# Altium PCB QuarterBridge_verL.PcbDoc
Units mil, origin at the board's own origin, x right, y up, seen from the top; angles counter-clockwise.
Board outline 2755.91 x 2562.99 mil, 2 copper layers (TopLayer, BottomLayer), stack 62.992 mil thick; 60 components, 67 nets, 267 pads, 42 vias.
Unrouted connection lines stored in the file: 66.
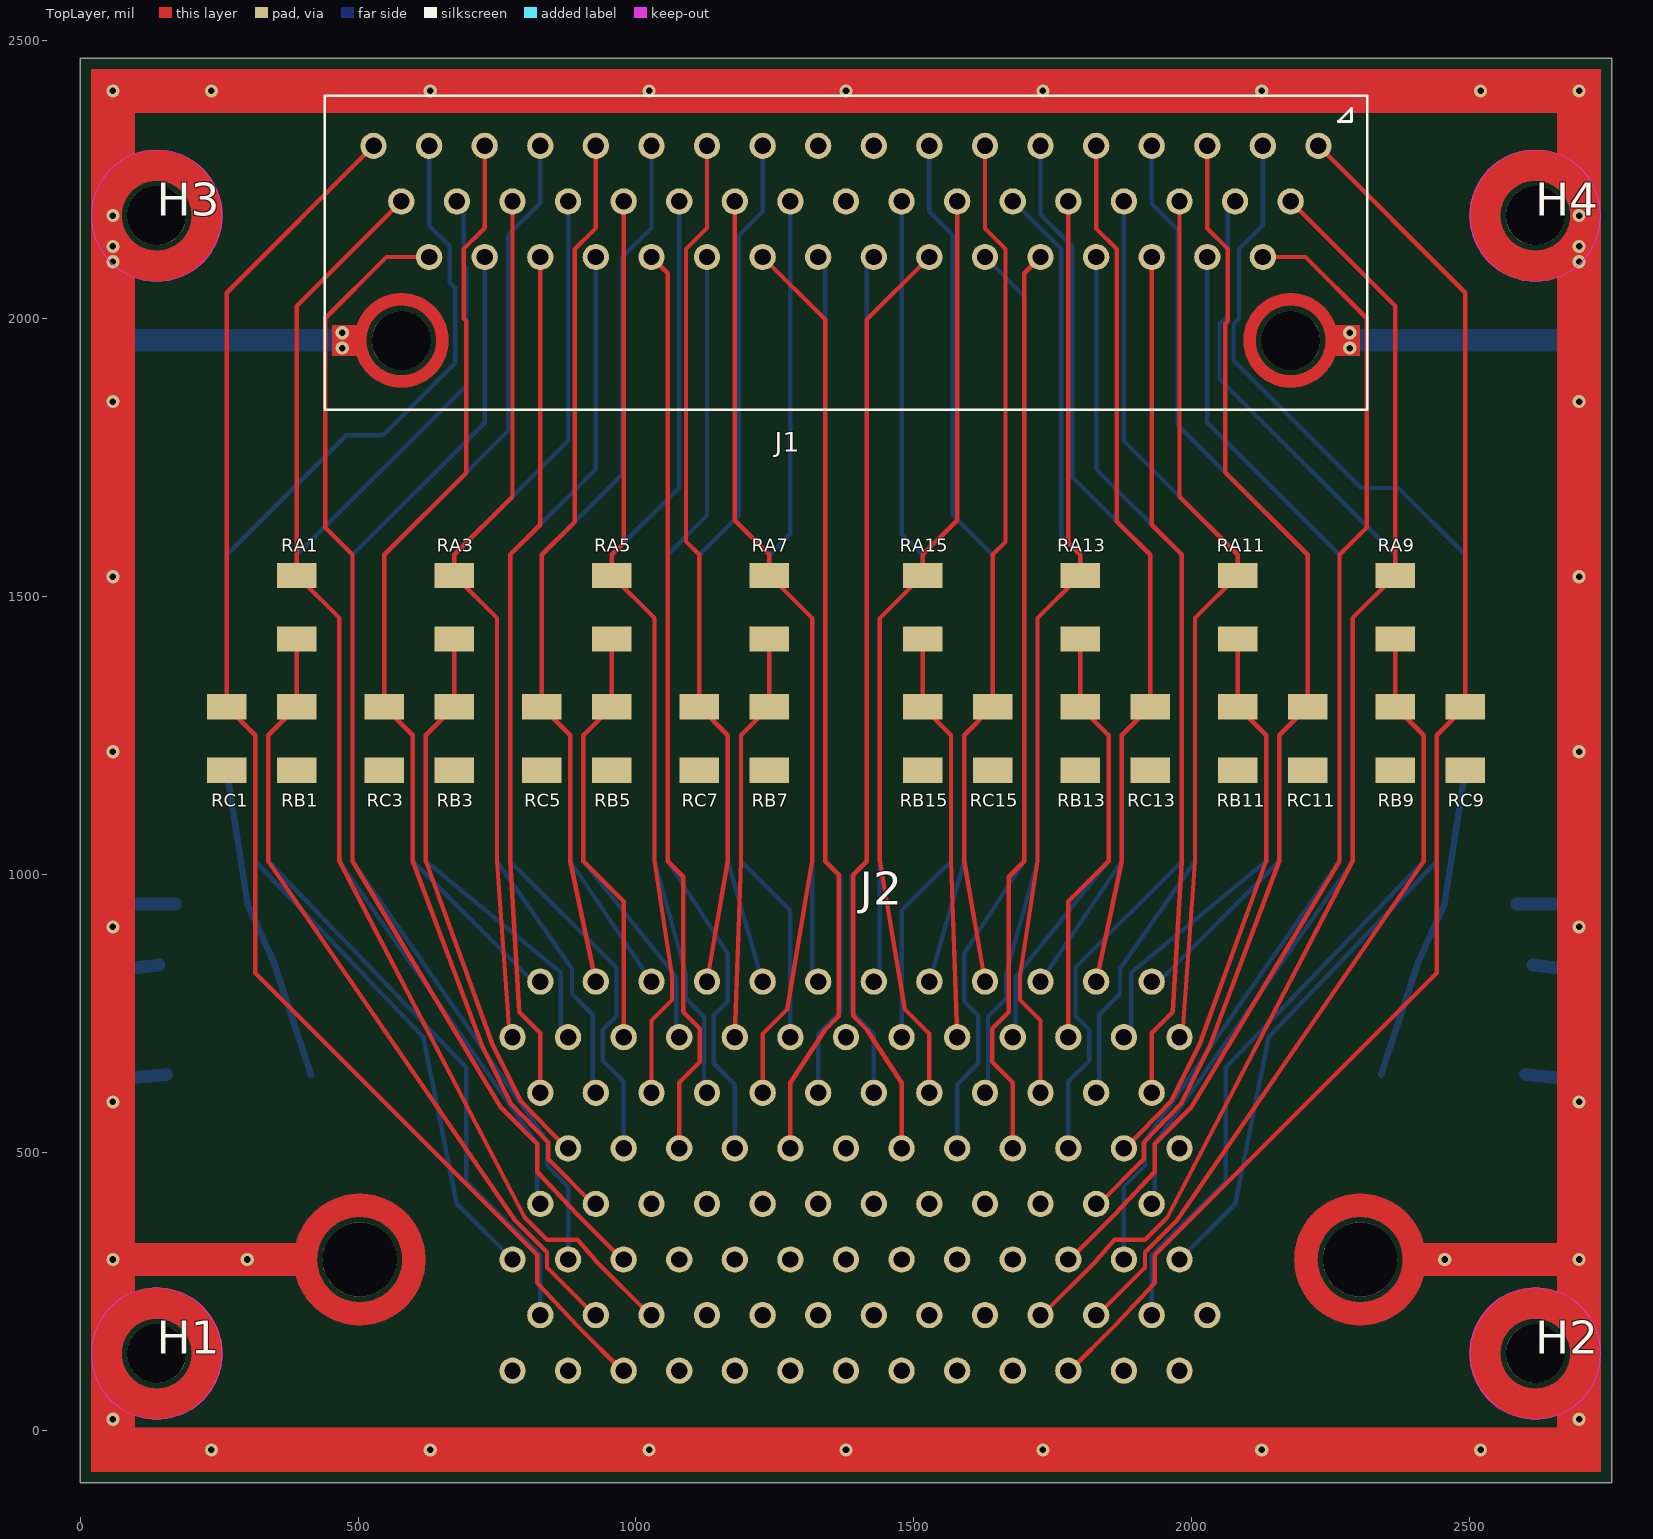
[diagram p0: TopLayer view]
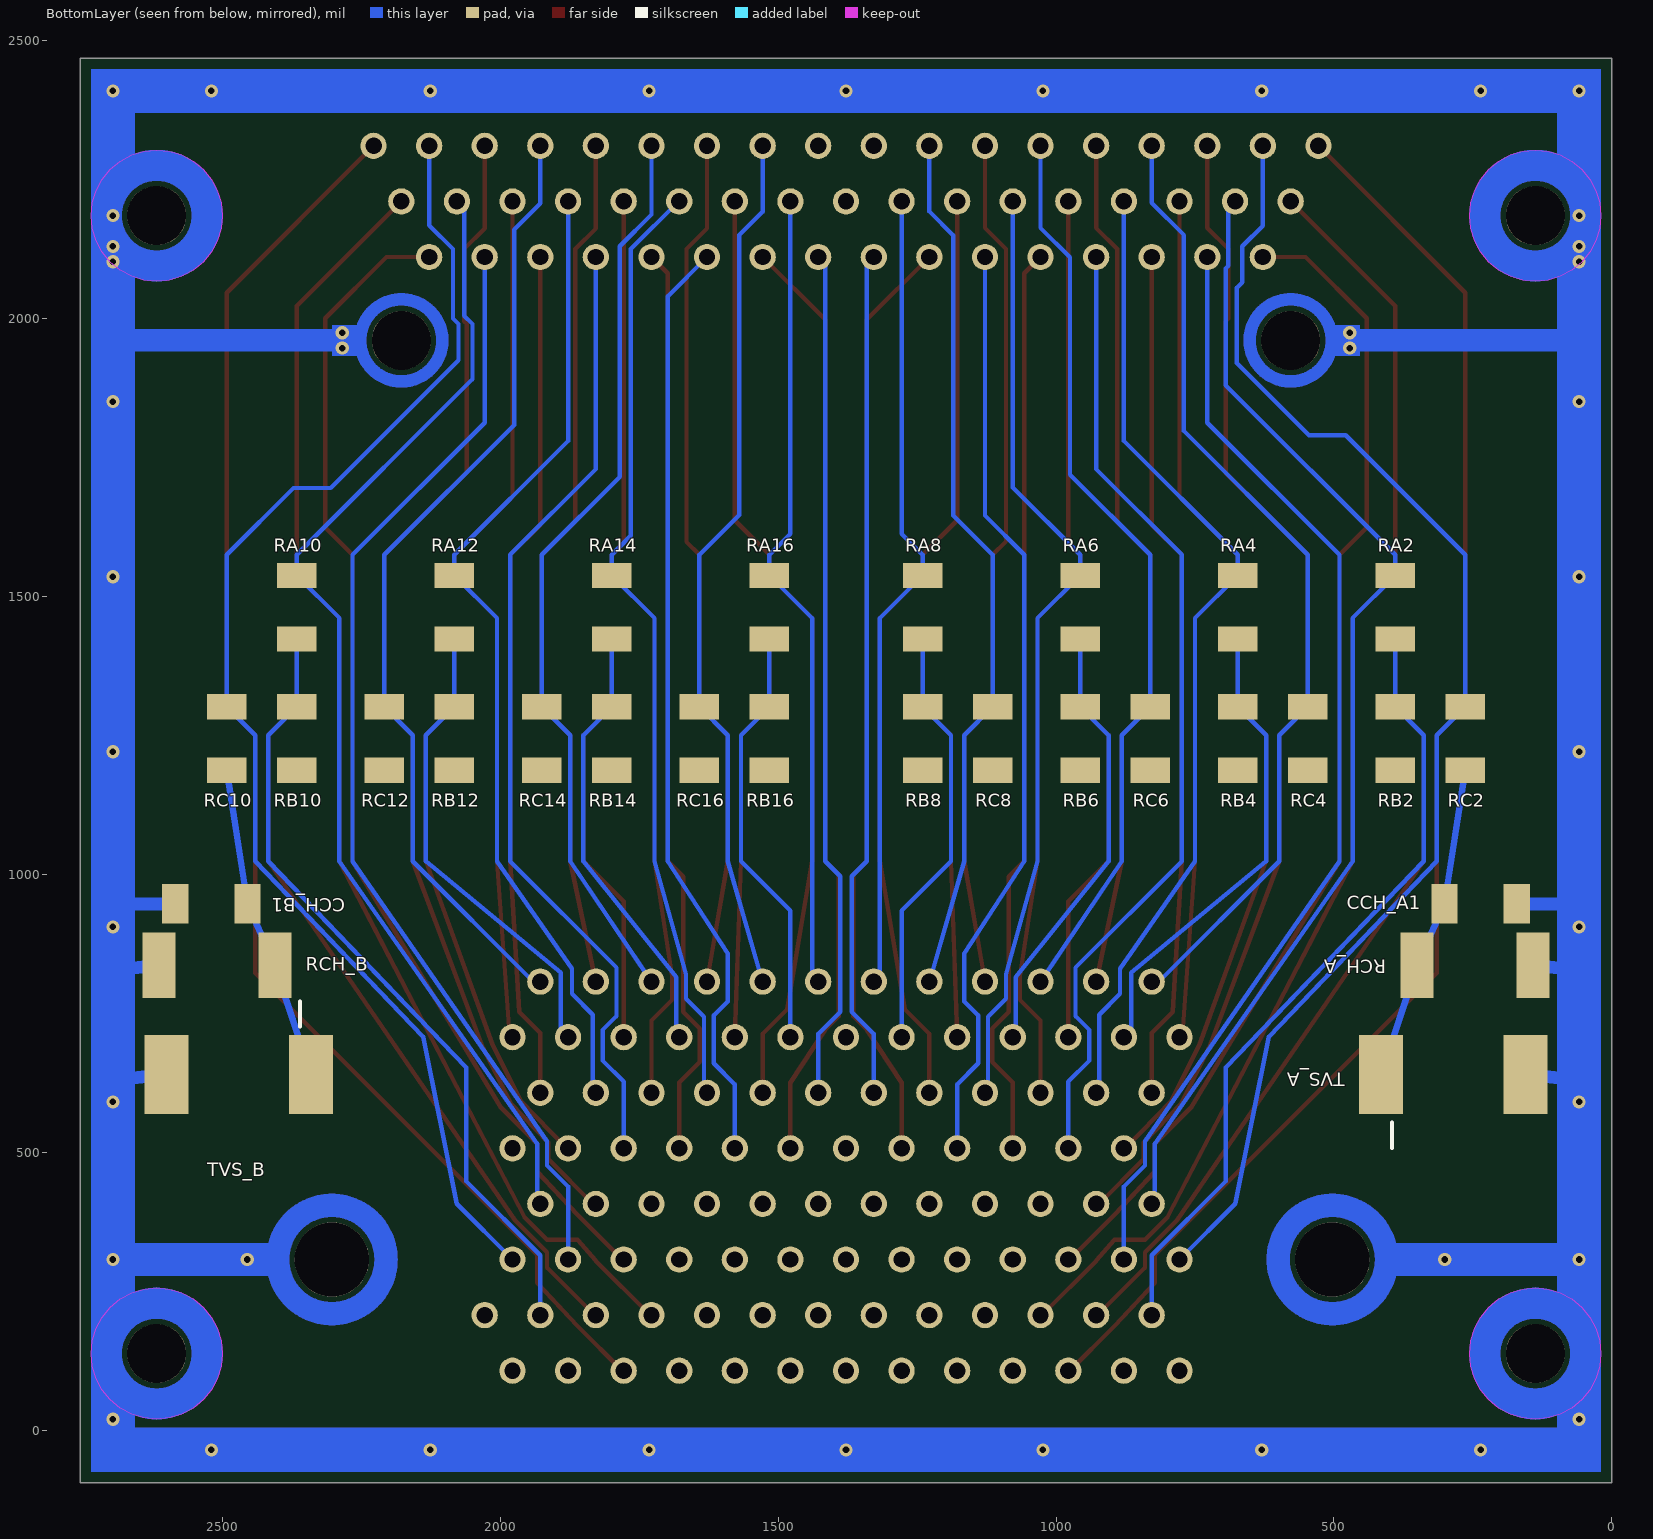
[diagram p1: BottomLayer view, seen from below]
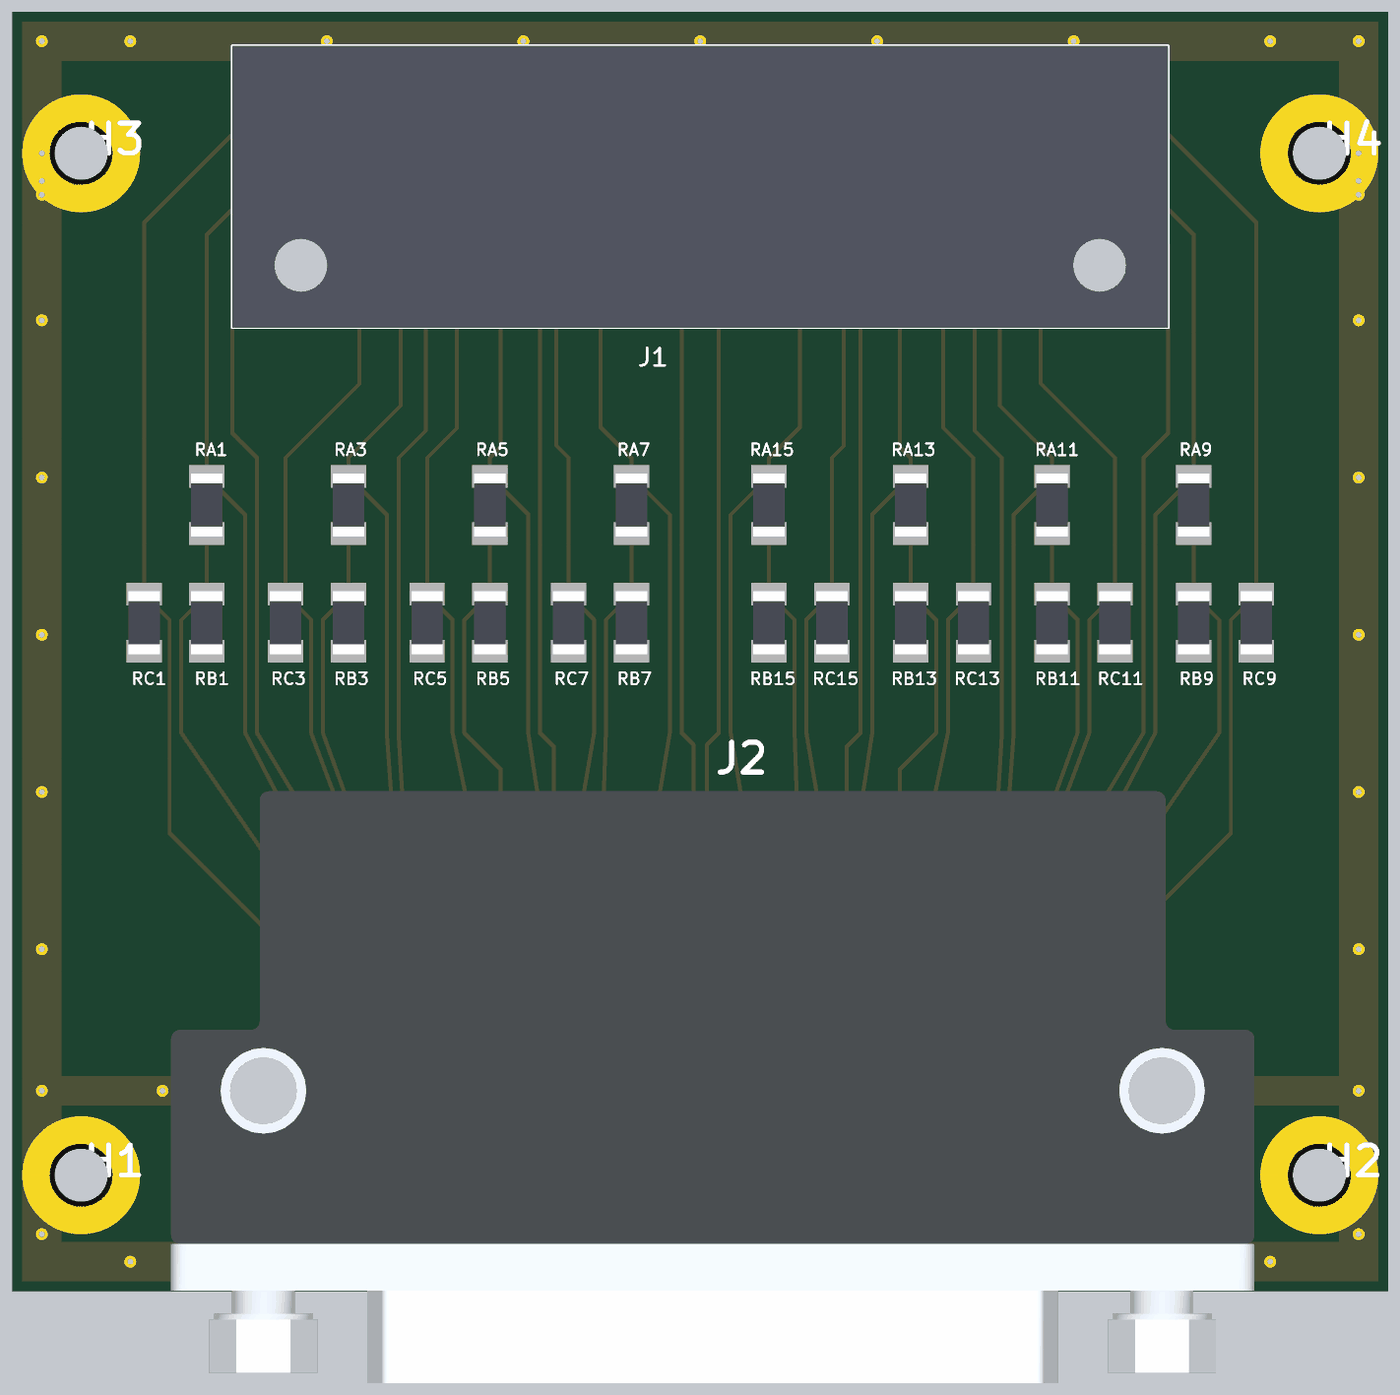
[diagram p2: 3D render of the assembled board from above, using the file's embedded part models]
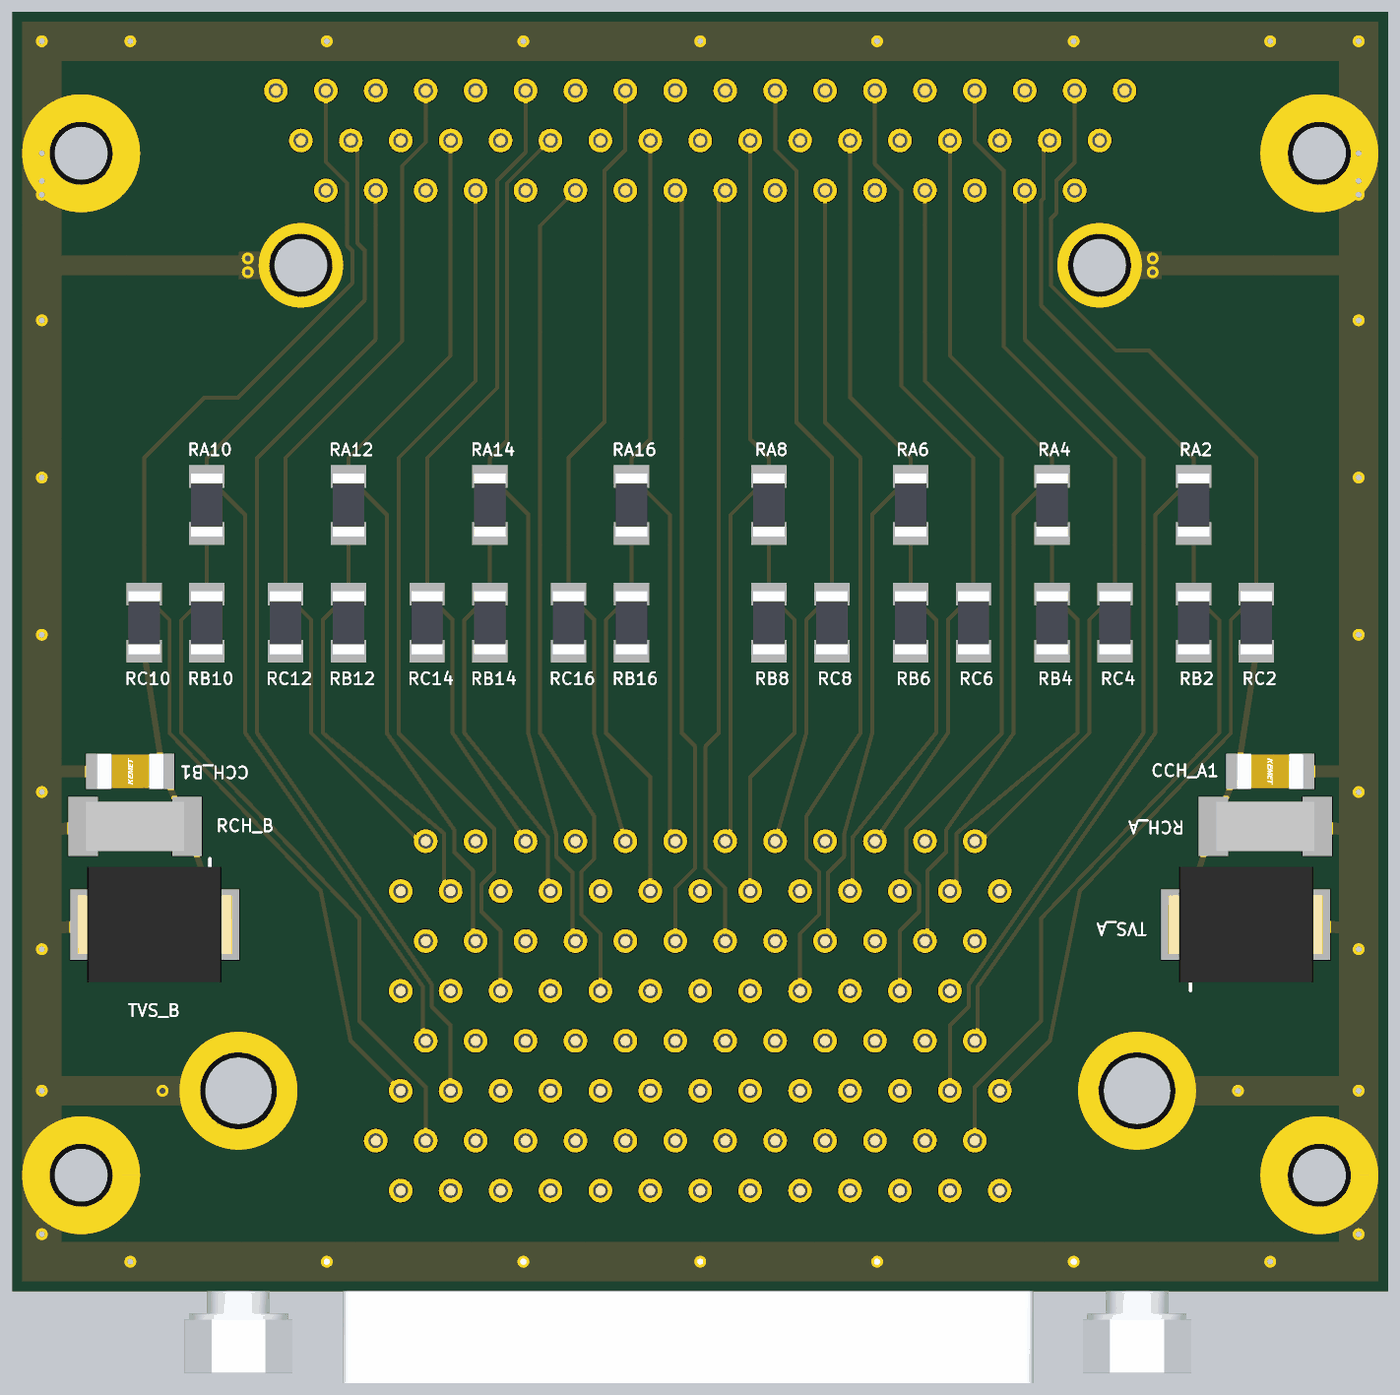
[diagram p3: 3D render of the assembled board from below, using the file's embedded part models]

## Layer stack, top to bottom
Top Solder: solder mask 0.4, Solder Resist, Dk 3.5
TopLayer: signal copper 1.378
CORE: core 60.2361, FR-4, Dk 4.2
BottomLayer: signal copper 1.378
Bottom Solder: solder mask 0.4, Solder Resist, Dk 3.5

## Board outline
0,-94.49 2755.91,-94.49 2755.91,2468.5 0,2468.5

## Design rules (kind name [scope] priority, off if disabled: settings)
Clearance CHASSIS_TO_AGND_2MM [InNet('CHASSIS_GND') vs InNet('AGND_A') Or InNet('AGND_B')] p1: gap=78.74 ignorepadtopadclearanceinfootprint=FALSE
Clearance [All] p2: gap=7.87 ignorepadtopadclearanceinfootprint=FALSE
HoleSize [All] p1: absolutevalues=TRUE maxlimit=157.48 minlimit=1 maxpercent=80.000 minpercent=20.000
PolygonConnect [All] p1: connectstyle=Relief reliefconductorwidth=10 reliefentries=4 polygonreliefangle="90 Angle" airgapwidth=10
RoutingVias [All] p1: holewidth=11.81 width=23.62 viastyle="Through Hole" minholewidth=11.81 minwidth=23.62 maxholewidth=15.75 maxwidth=31.5
SolderMaskExpansion TENT_CHASSIS_VIAS [IsVia And InNet('CHASSIS_GND')] p1: expansion=-15 istentingtop=FALSE
SolderMaskExpansion [All] p2: expansion=0 istentingtop=FALSE
Width WIDTH_CHASSIS_BRIDGE [InNet('CHASSIS_GND')] p1: maxlimit=40 minlimit=8 preferedwidth=24
Width [All] p2: maxlimit=23.62 minlimit=7.87 preferedwidth=7.87
29 further rules are at their usual default settings.

## Components (designator, comment, footprint, x,y, rotation, side; value= is the part's Value field where it differs from the comment)
CCH_A1 "2.2nF / 2kV" QB_CHASSIS_C1206_X7R_2KV 236.22,946.85 r0 bottom
CCH_B1 "2.2nF / 2kV" QB_CHASSIS_C1206_X7R_2KV 2519.68,946.85 r180 bottom
H1 "Comment" QB69_M2P5_NPTH 137.8,137.8 r0 top
H2 "Comment" QB69_M2P5_NPTH 2618.11,137.8 r0 top
H3 "Comment" QB69_M2P5_NPTH 137.8,2185.04 r0 top
H4 "Comment" QB69_M2P5_NPTH 2618.11,2185.04 r0 top
J1 "M83513/17-G02NP 51 PIN BR verL" QB51_BR_PIN_VERL 1377.95,1960.63 r0 top
J2 "100 PIN CBR GROUPED" QB69_CBR100_PIN_R1 1402.95,307 r0 top
RA1 "120R" QB69_TNPU1206_R1 389.76,1480.71 r270 top
RA2 "120R" QB69_TNPU1206_R1 389.76,1480.71 r270 bottom
RA3 "120R" QB69_TNPU1206_R1 673.23,1480.71 r270 top
RA4 "120R" QB69_TNPU1206_R1 673.23,1480.71 r270 bottom
RA5 "120R" QB69_TNPU1206_R1 956.69,1480.71 r270 top
RA6 "120R" QB69_TNPU1206_R1 956.69,1480.71 r270 bottom
RA7 "120R" QB69_TNPU1206_R1 1240.16,1480.71 r270 top
RA8 "120R" QB69_TNPU1206_R1 1240.16,1480.71 r270 bottom
RA9 "120R" QB69_TNPU1206_R1 2366.14,1480.71 r270 top
RA10 "120R" QB69_TNPU1206_R1 2366.14,1480.71 r270 bottom
RA11 "120R" QB69_TNPU1206_R1 2082.68,1480.71 r270 top
RA12 "120R" QB69_TNPU1206_R1 2082.68,1480.71 r270 bottom
RA13 "120R" QB69_TNPU1206_R1 1799.21,1480.71 r270 top
RA14 "120R" QB69_TNPU1206_R1 1799.21,1480.71 r270 bottom
RA15 "120R" QB69_TNPU1206_R1 1515.75,1480.71 r270 top
RA16 "120R" QB69_TNPU1206_R1 1515.75,1480.71 r270 bottom
RB1 "120R" QB69_TNPU1206_R1 389.76,1244.49 r270 top
RB2 "120R" QB69_TNPU1206_R1 389.76,1244.49 r270 bottom
RB3 "120R" QB69_TNPU1206_R1 673.23,1244.49 r270 top
RB4 "120R" QB69_TNPU1206_R1 673.23,1244.49 r270 bottom
RB5 "120R" QB69_TNPU1206_R1 956.69,1244.49 r270 top
RB6 "120R" QB69_TNPU1206_R1 956.69,1244.49 r270 bottom
RB7 "120R" QB69_TNPU1206_R1 1240.16,1244.49 r270 top
RB8 "120R" QB69_TNPU1206_R1 1240.16,1244.49 r270 bottom
RB9 "120R" QB69_TNPU1206_R1 2366.14,1244.49 r270 top
RB10 "120R" QB69_TNPU1206_R1 2366.14,1244.49 r270 bottom
RB11 "120R" QB69_TNPU1206_R1 2082.68,1244.49 r270 top
RB12 "120R" QB69_TNPU1206_R1 2082.68,1244.49 r270 bottom
RB13 "120R" QB69_TNPU1206_R1 1799.21,1244.49 r270 top
RB14 "120R" QB69_TNPU1206_R1 1799.21,1244.49 r270 bottom
RB15 "120R" QB69_TNPU1206_R1 1515.75,1244.49 r270 top
RB16 "120R" QB69_TNPU1206_R1 1515.75,1244.49 r270 bottom
RC1 "120R" QB69_TNPU1206_R1 263.78,1244.49 r90 top
RC2 "120R" QB69_TNPU1206_R1 263.78,1244.49 r90 bottom
RC3 "120R" QB69_TNPU1206_R1 547.24,1244.49 r90 top
RC4 "120R" QB69_TNPU1206_R1 547.24,1244.49 r90 bottom
RC5 "120R" QB69_TNPU1206_R1 830.71,1244.49 r90 top
RC6 "120R" QB69_TNPU1206_R1 830.71,1244.49 r90 bottom
RC7 "120R" QB69_TNPU1206_R1 1114.17,1244.49 r90 top
RC8 "120R" QB69_TNPU1206_R1 1114.17,1244.49 r90 bottom
RC9 "120R" QB69_TNPU1206_R1 2492.13,1244.49 r90 top
RC10 "120R" QB69_TNPU1206_R1 2492.13,1244.49 r90 bottom
RC11 "120R" QB69_TNPU1206_R1 2208.66,1244.49 r90 top
RC12 "120R" QB69_TNPU1206_R1 2208.66,1244.49 r90 bottom
RC13 "120R" QB69_TNPU1206_R1 1925.2,1244.49 r90 top
RC14 "120R" QB69_TNPU1206_R1 1925.2,1244.49 r90 bottom
RC15 "120R" QB69_TNPU1206_R1 1641.73,1244.49 r90 top
RC16 "120R" QB69_TNPU1206_R1 1641.73,1244.49 r90 bottom
RCH_A "2M / 2kV max" QB_CHASSIS_R2010_HV 246.06,836.61 r0 bottom
RCH_B "2M / 2kV max" QB_CHASSIS_R2010_HV 2509.84,836.61 r180 bottom
TVS_A "SMCJ5.0A" QB_CHASSIS_SMC_AK 285.43,639.76 r0 bottom
TVS_B "SMCJ5.0A" QB_CHASSIS_SMC_AK 2470.47,639.76 r180 bottom

## Footprints (in the part's own frame and the unit in brackets; to place one, negate y for a bottom-side part, rotate by r counter-clockwise, add the part's x,y. Pads: shape width x height; smd on the part's side, far side on the other; paste and mask are expansions set on the pad)
QB51_BR_PIN_VERL [mm] "BR 51 male M83513/17; 18/17/16 rows; PCB mount pitch40.64mm; per annotated user pattern"
  round 1.2 hole 0.75 mask+0.05: 1(21.59,8.89) 2(19.05,8.89) 3(16.51,8.89) 4(13.97,8.89) 5(11.43,8.89) 6(8.89,8.89) 7(6.35,8.89) 8(3.81,8.89) 9(1.27,8.89) 10(-1.27,8.89) 11(-3.81,8.89) 12(-6.35,8.89) 13(-8.89,8.89) 14(-11.43,8.89) 15(-13.97,8.89) 16(-16.51,8.89) 17(-19.05,8.89) 18(-21.59,8.89) 19(20.32,6.35) 20(17.78,6.35) 21(15.24,6.35) 22(12.7,6.35) 23(10.16,6.35) 24(7.62,6.35) 25(5.08,6.35) 26(2.54,6.35) 27(0,6.35) 28(-2.54,6.35) 29(-5.08,6.35) 30(-7.62,6.35) 31(-10.16,6.35) 32(-12.7,6.35) 33(-15.24,6.35) 34(-17.78,6.35) 35(-20.32,6.35) 36(19.05,3.81) 37(16.51,3.81) 38(13.97,3.81) 39(11.43,3.81) 40(8.89,3.81) 41(6.35,3.81) 42(3.81,3.81) 43(1.27,3.81) 44(-1.27,3.81) 45(-3.81,3.81) 46(-6.35,3.81) 47(-8.89,3.81) 48(-11.43,3.81) 49(-13.97,3.81) 50(-16.51,3.81) 51(-19.05,3.81)
  round 2.7 hole 2.7 unplated mask+0: ""(-20.32,0) ""(20.32,0)
  silkscreen extent -23.81,-3.17 23.81,11.17, body extent -23.81,-3.17 23.81,11.17, height 8.92
QB69_CBR100_PIN_R1 [mm] "CATALOG PIN draft; component-side view; drill sizes provisional"
  round 1.2 hole 0.75 mask+0.05: 1(-15.875,-5.08) 2(-14.605,-2.54) 3(-13.335,-5.08) 4(-12.065,-2.54) 5(-10.795,-5.08) 6(-9.525,-2.54) 7(-8.255,-5.08) 8(-6.985,-2.54) 9(-5.715,-5.08) 10(-4.445,-2.54) 11(-3.175,-5.08) 12(-1.905,-2.54) 13(-0.635,-5.08) 14(0.635,-2.54) 15(1.905,-5.08) 16(3.175,-2.54) 17(4.445,-5.08) 18(5.715,-2.54) 19(6.985,-5.08) 20(8.255,-2.54) 21(9.525,-5.08) 22(10.795,-2.54) 23(12.065,-5.08) 24(13.335,-2.54) 25(14.605,-5.08) 26(15.875,-2.54) 27(-15.875,0) 28(-14.605,2.54) 29(-13.335,0) 30(-12.065,2.54) 31(-10.795,0) 32(-9.525,2.54) 33(-8.255,0) 34(-6.985,2.54) 35(-5.715,0) 36(-4.445,2.54) 37(-3.175,0) 38(-1.905,2.54) 39(-0.635,0) 40(0.635,2.54) 41(1.905,0) 42(3.175,2.54) 43(4.445,0) 44(5.715,2.54) 45(6.985,0) 46(8.255,2.54) 47(9.525,0) 48(10.795,2.54) 49(12.065,0) 50(13.335,2.54) 51(14.605,0) 52(-14.605,7.62) 53(-13.335,5.08) 54(-12.065,7.62) 55(-10.795,5.08) 56(-9.525,7.62) 57(-8.255,5.08) 58(-6.985,7.62) 59(-5.715,5.08) 60(-4.445,7.62) 61(-3.175,5.08) 62(-1.905,7.62) 63(-0.635,5.08) 64(0.635,7.62) 65(1.905,5.08) 66(3.175,7.62) 67(4.445,5.08) 68(5.715,7.62) 69(6.985,5.08) 70(8.255,7.62) 71(9.525,5.08) 72(10.795,7.62) 73(12.065,5.08) 74(13.335,7.62) 75(14.605,5.08) 76(-15.875,10.16) 77(-14.605,12.7) 78(-13.335,10.16) 79(-12.065,12.7) 80(-10.795,10.16) 81(-9.525,12.7) 82(-8.255,10.16) 83(-6.985,12.7) 84(-5.715,10.16) 85(-4.445,12.7) 86(-3.175,10.16) 87(-1.905,12.7) 88(-0.635,10.16) 89(0.635,12.7) 90(1.905,10.16) 91(3.175,12.7) 92(4.445,10.16) 93(5.715,12.7) 94(6.985,10.16) 95(8.255,12.7) 96(9.525,10.16) 97(10.795,12.7) 98(12.065,10.16) 99(13.335,12.7) 100(14.605,10.16)
  round 3.4 hole 3.4 unplated mask+0: ""(-22.86,0) ""(22.86,0)
  body extent -27.56,-14.88 27.56,15.24, height 10.01
QB69_M2P5_NPTH [mm] "M2.5 NPTH 2.7mm, 6mm tool envelope"
  round 2.7 hole 2.7 unplated mask+0: ""(0,0)
QB69_TNPU1206_R1 [mm] "Vishay doc28950 p1 IPC7351 reflow 1206; G1.75 Y1.15 X1.80 Z4.05 mm"
  rect 1.15x1.8 smd: 1(-1.45,0) 2(1.45,0)
  body extent -1.6,-0.8 1.6,0.8, height 0.55
QB_CHASSIS_C1206_X7R_2KV [mm] "KEMET individual specsheet; maximum package dimensions; designer HV lands have 2.1mm inner copper gap."
  rect 1.2x1.8 smd paste+0 mask+0.05: 1(-1.65,0) 2(1.65,0)
  body extent -1.7,-0.9 1.7,0.9, height 1.75
QB_CHASSIS_R2010_HV [mm] "Bourns CHV datasheet; 2010 0.5W voltage ceiling 2kV; continuous 2kV at 2M would require 2W and is NOT qualified."
  rect 1.5x3 smd paste+0 mask+0.05: 1(-2.65,0) 2(2.65,0)
  body extent -2.5,-1.25 2.5,1.25, height 0.6
QB_CHASSIS_SMC_AK [mm] "Vishay document88394; pin1=Anode, pin2=Cathode. Land gap4.6mm, lands2x3.6mm."
  rect 2x3.6 smd paste+0 mask+0.05: 1(-3.3,0) 2(3.3,0)
  silkscreen extent 2.8,2.2 2.8,3.35, body extent -3.95,-2.95 3.95,2.95, height 2.26

## Part data
CCH_A1 CCH_B1: library part CHASSIS_CAP_HV
H1 H2 H3 H4: library part QB69_M2P5_NPTH
J1: library part QB51_BR_INPUT_VERL
J2: library part QB100_OUTPUT_ROUNDED
RA1 RA2 RA3 RA4 RA5 RA6 RA7 RA8 RA9 RA10 RA11 RA12 RA13 RA14 RA15 RA16 RB1 RB2 RB3 RB4 RB5 RB6 RB7 RB8 RB9 RB10 RB11 RB12 RB13 RB14 RB15 RB16 RC1 RC2 RC3 RC4 RC5 RC6 RC7 RC8 RC9 RC10 RC11 RC12 RC13 RC14 RC15 RC16: library part TNPU1206120RAZEN00_ANSI_1
RCH_A RCH_B: library part CHASSIS_HV_R_2M
TVS_A TVS_B: library part CHASSIS_TVS_SMCJ

## Via types
v1: diameter 23.62, hole 11.81, TopLayer to BottomLayer, 42 vias

## Nets (pads, with @x,y where several pads share a name; then routed paths per layer and width w, separated by ;. In a path a pad name is that pad's centre, name@x,y a point inside that pad or via, vN(x,y) a via of type N, cw(c..) or ccw(c..) an arc to the next point about the centre after c; other vN are vias at no path point)
AGND_A: CCH_A1.2 J2.1 J2.3 J2.7 J2.8 J2.9 J2.10 J2.11 J2.12 J2.13 J2.32 J2.33 J2.34 J2.35 J2.36 J2.37 J2.38 J2.39 J2.63 J2.88 RB1.2 RB2.2 RB3.2 RB4.2 RB5.2 RB6.2 RB7.2 RB8.2 RC1.1 RC2.1 RC3.1 RC4.1 RC5.1 RC6.1 RC7.1 RC8.1 RCH_A.2 TVS_A.2 | length 571.5
  BottomLayer w11.81: RC2.1 CCH_A1.2 RCH_A.2 TVS_A.2
AGND_B: CCH_B1.2 J2.14 J2.15 J2.16 J2.17 J2.18 J2.19 J2.23 J2.25 J2.26 J2.40 J2.41 J2.42 J2.43 J2.44 J2.45 J2.46 J2.75 RB9.2 RB10.2 RB11.2 RB12.2 RB13.2 RB14.2 RB15.2 RB16.2 RC9.1 RC10.1 RC11.1 RC12.1 RC13.1 RC14.1 RC15.1 RC16.1 RCH_B.2 TVS_B.2 | length 571.5
  BottomLayer w11.81: TVS_B.2 RCH_B.2 CCH_B1.2 RC10.1
CHASSIS_GND: CCH_A1.1 CCH_B1.1 RCH_A.1 RCH_B.1 TVS_A.1 TVS_B.1 | length 584.8
  BottomLayer w23.62: 59.06,629.92 TVS_A.1 ; 59.06,826.77 RCH_A.1 ; 59.06,946.85 CCH_A1.1 ; CCH_B1.1 2696.85,946.85 ; TVS_B.1 2696.85,629.92 ; RCH_B.1 2696.85,826.77
  other v1: 236.22,-35.43 629.92,-35.43 1023.62,-35.43 1377.95,-35.43 1732.28,-35.43 2125.98,-35.43 2519.68,-35.43 59.06,19.68 2696.85,19.68 59.06,307.09 300.79,307 2455.12,307 2696.85,307.09 59.06,590.55 2696.85,590.55 59.06,905.51 2696.85,905.51 59.06,1220.47 2696.85,1220.47 59.06,1535.43 2696.85,1535.43 59.06,1850.39 2696.85,1850.39 471.65,1946.85 2284.25,1946.85 471.65,1974.41 2284.25,1974.41 59.06,2102.06 2696.85,2102.06 59.06,2129.61 2696.85,2129.61 59.06,2185.04 2696.85,2185.04 59.06,2409.45 236.22,2409.45 629.92,2409.45 1023.62,2409.45 1377.95,2409.45 1732.28,2409.45 2125.98,2409.45 2519.68,2409.45 2696.85,2409.45
P+_01: J1.35 J2.6 RA1.1 | length 2319.2
  TopLayer w7.87: J1.35 389.76,2022.44 389.76,1574.8 RA1.1 466.54,1461.02 466.54,1023.62 800,382.5 840,342.5 895,342.5 927.5,305 J2.6@1025.5,207
P+_02: J1.34 J2.28 RA2.1 | length 2058.6
  BottomLayer w7.87: J1.34@690,2198.58 690,2095 695,2090 695,1880.04 389.76,1574.8 RA2.1 466.54,1461.02 466.54,1023.62 822.5,515 J2.28@822.5,412.45
P+_03: J1.33 J2.76 RA3.1 | length 1574.2
  TopLayer w7.87: J2.76@772.5,712.45 750,1023.62 750,1461.02 RA3.1 673.23,1574.8 777.95,1679.53 J1.33
P+_04: J1.32 J2.54 RA4.1 | length 1772.7
  BottomLayer w7.87: J1.32 877.95,1779.53 673.23,1574.8 RA4.1 750,1461.02 750,1023.62 885,830 885,784.99 922.5,747.49 J2.54@922.5,612.45
P+_05: J1.31 J2.56 RA5.1 | length 1662
  TopLayer w7.87: J1.31 977.95,1596.06 956.69,1574.8 RA5.1 1033.46,1461.02 1033.46,1023.62 1065,817.5 1065,774.14 1027.95,737.09 J2.56
P+_06: J1.30 J2.58 RA6.1 | length 1701.4
  BottomLayer w7.87: J1.30 1077.95,1696.06 956.69,1574.8 RA6.1 1033.46,1461.02 1033.46,1023.62 1090,820 1090,776.24 1122.5,743.74 J2.58@1122.5,612.45
P+_07: J1.29 J2.60 RA7.1 | length 1683.3
  TopLayer w7.87: J1.29 1177.95,1637.01 1240.16,1574.8 RA7.1 1316.93,1461.02 1316.93,1023.62 1272.5,757.5 1227.95,712.95 J2.60
P+_08: J1.28 J2.87 RA8.1 | length 1440.1
  BottomLayer w7.87: J1.28 1277.95,1612.6 1240.16,1574.8 RA8.1 1316.93,1461.02 1316.93,1023.62 J2.87@1316.93,818.02
P+_09: J1.19 J2.20 RA9.1 | length 2319.2
  TopLayer w7.87: J2.20@1730.41,207 1828.41,305 1860.91,342.5 1915.91,342.5 1955.91,382.5 2289.37,1023.62 2289.37,1461.02 RA9.1 2366.14,1574.8 2366.14,2022.44 J1.19
P+_10: J1.20 J2.50 RA10.1 | length 2066.4
  BottomLayer w7.87: J2.50@1933.41,412.45 1933.41,515 2289.37,1023.62 2289.37,1461.02 RA10.1 2366.14,1574.8 2050,1890.94 2050,1990 2065,2005 J1.20@2065,2197.68
P+_11: J1.21 J2.100 RA11.1 | length 1574.2
  TopLayer w7.87: J1.21 1977.95,1679.53 2082.68,1574.8 RA11.1 2005.91,1461.02 2005.91,1023.62 J2.100@1983.41,712.45
P+_12: J1.22 J2.72 RA12.1 | length 1772.7
  BottomLayer w7.87: J2.72@1833.41,612.45 1833.41,747.49 1870.91,784.99 1870.91,830 2005.91,1023.62 2005.91,1461.02 RA12.1 2082.68,1574.8 1877.95,1779.53 J1.22
P+_13: J1.23 J2.70 RA13.1 | length 1662
  TopLayer w7.87: J2.70 1727.95,737.09 1690.91,774.14 1690.91,817.5 1722.44,1023.62 1722.44,1461.02 RA13.1 1799.21,1574.8 1777.95,1596.06 J1.23
P+_14: J1.24 J2.68 RA14.1 | length 1700.8
  BottomLayer w7.87: J2.68@1633.41,612.45 1633.41,743.74 1665.91,776.24 1665.91,820 1722.44,1023.62 1722.44,1461.02 RA14.1 1799.21,1574.8 1765,1609.02 1765,2125 J1.24@1679.37,2210.63
P+_15: J1.25 J2.66 RA15.1 | length 1683.3
  TopLayer w7.87: J2.66 1527.95,712.95 1483.41,757.5 1438.98,1023.62 1438.98,1461.02 RA15.1 1515.75,1574.8 1577.95,1637.01 J1.25
P+_16: J1.26 J2.89 RA16.1 | length 1440.1
  BottomLayer w7.87: J2.89@1438.98,818.02 1438.98,1023.62 1438.98,1461.02 RA16.1 1515.75,1574.8 1477.95,1612.6 J1.26
PS+_01: J1.51 J2.31 | length 2109.7
  TopLayer w7.87: J1.51 551.18,2110.63 440.94,2000.39 440.94,1624.02 490.16,1574.8 490.16,1023.62 757.5,580 822.5,515 822.5,465 895,387.5 J2.31@975.5,307
PS+_02: J1.50 J2.29 | length 2027.4
  BottomLayer w7.87: J1.50 727.95,1812.6 490.16,1574.8 490.16,1023.62 840,520 840,476.24 877.95,438.29 J2.29
PS+_03: J1.49 J2.52 | length 1542.3
  TopLayer w7.87: J2.52 827.95,714.55 790,752.5 773.62,1023.62 773.62,1574.8 827.95,1629.13 J1.49
PS+_04: J1.48 J2.55 | length 1772.9
  BottomLayer w7.87: J1.48 927.95,1729.13 773.62,1574.8 773.62,1023.62 965,832.24 965,745 940,720 940,665 977.95,627.05 J2.55
PS+_05: J1.47 J2.57 | length 1655
  TopLayer w7.87: J1.47 1057.09,2081.5 1057.09,1574.8 1057.09,1023.62 1085,995.71 1085,752.5 1115,722.5 1115,662.5 1077.95,625.45 J2.57
PS+_06: J1.46 J2.59 | length 1691
  BottomLayer w7.87: J1.46 1127.95,1645.67 1057.09,1574.8 1057.09,1023.62 1165,857.5 1165,771.25 1140,746.25 1140,660 1177.95,622.05 J2.59
PS+_07: J1.45 J2.61 | length 1689.3
  TopLayer w7.87: J1.45 1340.55,1998.03 1340.55,1574.8 1340.55,1023.62 1365,999.17 1365,745 1340,720 1277.95,625.45 J2.61
PS+_08: J1.44 J2.62 | length 1518.6
  BottomLayer w7.87: J2.62 1327.95,712.95 1367.5,752.5 1367.5,996.67 1340.55,1023.62 1340.55,1574.8 J1.44@1340.55,2098.03
PS+_09: J1.36 J2.47 | length 2109.7
  TopLayer w7.87: J2.47@1780.41,307 1860.91,387.5 1933.41,465 1933.41,515 1998.41,580 2265.75,1023.62 2265.75,1574.8 2314.96,1624.02 2314.96,2000.39 2204.72,2110.63 J1.36
PS+_10: J1.37 J2.49 | length 2027.4
  BottomLayer w7.87: J2.49 1877.95,438.29 1915.91,476.24 1915.91,520 2265.75,1023.62 2265.75,1574.8 2027.95,1812.6 J1.37
PS+_11: J1.38 J2.74 | length 1542.3
  TopLayer w7.87: J2.74 1927.95,714.55 1965.91,752.5 1982.28,1023.62 1982.28,1574.8 1927.95,1629.13 J1.38
PS+_12: J1.39 J2.71 | length 1772.9
  BottomLayer w7.87: J2.71 1777.95,627.05 1815.91,665 1815.91,720 1790.91,745 1790.91,832.24 1982.28,1023.62 1982.28,1574.8 1827.95,1729.13 J1.39
PS+_13: J1.40 J2.69 | length 1655
  TopLayer w7.87: J2.69 1677.95,625.45 1640.91,662.5 1640.91,722.5 1670.91,752.5 1670.91,995.71 1698.82,1023.62 1698.82,1574.8 1698.82,2081.5 J1.40
PS+_14: J1.41 J2.67 | length 1691
  BottomLayer w7.87: J2.67 1577.95,622.05 1615.91,660 1615.91,746.25 1590.91,771.25 1590.91,857.5 1698.82,1023.62 1698.82,1574.8 1698.82,2039.76 J1.41
PS+_15: J1.42 J2.65 | length 1689.3
  TopLayer w7.87: J2.65 1477.95,625.45 1415.91,720 1390.91,745 1390.91,999.17 1415.35,1023.62 1415.35,1574.8 1415.35,1998.03 J1.42
PS+_16: J1.43 J2.64 | length 1518.6
  BottomLayer w7.87: J1.43@1415.35,2098.03 1415.35,1574.8 1415.35,1023.62 1388.41,996.67 1388.41,752.5 1427.95,712.95 J2.64
S+_01: J1.18 J2.5 RC1.2 | length 2606.5
  TopLayer w7.87: J1.18 263.78,2046.46 263.78,1574.8 RC1.2 314.96,1250.39 314.96,1023.62 314.96,822.54 822.5,315 822.5,265 895,187.5 J2.5@975.5,107
S+_02: J1.17 J2.27 RC2.2 | length 2422.3
  BottomLayer w7.87: J1.17 627.95,2167.05 665,2130 665,2065 675,2055 675,1920 545,1790 478.98,1790 263.78,1574.8 RC2.2 314.96,1250.39 314.96,1023.62 617.5,707.5 677.5,407.45 J2.27
S+_03: J1.16 J2.30 RC3.2 | length 2099.3
  TopLayer w7.87: J1.16 727.95,2162.95 690,2125 690,2000 695,1995 695,1722.56 547.24,1574.8 RC3.2 598.43,1250.39 598.43,1023.62 725,687.5 775,587.5 842.5,517.5 842.5,487.5 J2.30@923,407
S+_04: J1.15 J2.77 RC4.2 | length 1730.8
  BottomLayer w7.87: J2.77@815.05,807 598.43,1023.62 598.43,1250.39 RC4.2 547.24,1574.8 770,1797.56 770,2150 827.95,2207.95 J1.15
S+_05: J1.14 J2.79 RC5.2 | length 1570
  TopLayer w7.87: J2.79 881.89,1023.62 881.89,1250.39 RC5.2 830.71,1574.8 890,1634.09 890,2125 927.95,2162.95 J1.14
S+_06: J1.13 J2.81 RC6.2 | length 1651.2
  BottomLayer w7.87: J2.81 881.89,1023.62 881.89,1250.39 RC6.2 830.71,1574.8 975,1719.09 975,2110 1027.95,2162.95 J1.13
S+_07: J1.12 J2.83 RC7.2 | length 1553.8
  TopLayer w7.87: J2.83 1165.35,1023.62 1165.35,1250.39 RC7.2 1114.17,1574.8 1090,1598.98 1090,2125 1127.95,2162.95 J1.12
S+_08: J1.11 J2.85 RC8.2 | length 1580.8
  BottomLayer w7.87: J2.85 1165.35,1023.62 1165.35,1250.39 RC8.2 1114.17,1574.8 1185,1645.63 1185,2149.51 1227.95,2192.46 J1.11
S+_09: J1.1 J2.21 RC9.2 | length 2606.5
  TopLayer w7.87: J2.21@1780.41,107 1860.91,187.5 1933.41,265 1933.41,315 2440.94,822.54 2440.94,1023.62 2440.94,1250.39 RC9.2 2492.13,2046.46 J1.1
S+_10: J1.2 J2.51 RC10.2 | length 2427.7
  BottomLayer w7.87: J2.51 2078.41,407.45 2138.41,707.5 2440.94,1023.62 2440.94,1250.39 RC10.2 2492.13,1574.8 2371.93,1695 2305,1695 2075,1925 2075,1990 2085,2000 2085,2125 2127.95,2167.95 J1.2
S+_11: J1.3 J2.48 RC11.2 | length 2099.3
  TopLayer w7.87: J2.48@1832.91,407 1913.41,487.5 1913.41,517.5 1980.91,587.5 2030.91,687.5 2157.48,1023.62 2157.48,1250.39 RC11.2 2208.66,1574.8 2060,1723.46 2060,1990 2065,1995 2065,2125 2027.95,2162.05 J1.3
S+_12: J1.4 J2.99 RC12.2 | length 1730.8
  BottomLayer w7.87: J1.4 1927.95,2207.05 1975,2160 1975,1808.46 2208.66,1574.8 RC12.2 2157.48,1250.39 2157.48,1023.62 J2.99@1940.86,807
S+_13: J1.5 J2.97 RC13.2 | length 1570
  TopLayer w7.87: J2.97 1874.02,1023.62 1874.02,1250.39 RC13.2 1925.2,1574.8 1865,1635 1865,2125 1827.95,2162.05 J1.5
S+_14: J1.6 J2.95 RC14.2 | length 1651.2
  BottomLayer w7.87: J2.95 1874.02,1023.62 1874.02,1250.39 RC14.2 1925.2,1574.8 1785,1715 1785,2130 1727.95,2187.05 J1.6
S+_15: J1.7 J2.93 RC15.2 | length 1553
  TopLayer w7.87: J2.93 1590.55,1023.62 1590.55,1250.39 RC15.2 1641.73,1574.8 1665,1598.07 1665,2125 1627.95,2162.05 J1.7
S+_16: J1.8 J2.91 RC16.2 | length 1580.8
  BottomLayer w7.87: J2.91 1590.55,1023.62 1590.55,1250.39 RC16.2 1641.73,1574.8 1570,1646.54 1570,2150.19 1527.95,2192.23 J1.8
S-_01: J2.4 RA1.2 RB1.1 | length 1434.9
  TopLayer w7.87: RA1.2 RB1.1 338.58,1250.39 338.58,1023.62 782.5,377.5 840,320 840,292.5 J2.4@925.5,207
S-_02: J2.2 RA2.2 RB2.1 | length 1436.3
  BottomLayer w7.87: RA2.2 RB2.1 338.58,1250.39 338.58,1023.62 695,652.5 695,447.5 827.95,314.55 J2.2
S-_03: J2.53 RA3.2 RB3.1 | length 1004.5
  TopLayer w7.87: RA3.2 RB3.1 622.05,1250.39 622.05,1023.62 742.5,692.5 792.5,592.5 J2.53@875.5,507
S-_04: J2.78 RA4.2 RB4.1 | length 839.1
  BottomLayer w7.87: RA4.2 RB4.1 622.05,1250.39 622.05,1023.62 865,822.5 J2.78@865,719.95
S-_05: J2.80 RA5.2 RB5.1 | length 767.8
  TopLayer w7.87: RA5.2 RB5.1 905.51,1250.39 905.51,1023.62 977.95,951.18 J2.80
S-_06: J2.82 RA6.2 RB6.1 | length 791
  BottomLayer w7.87: RA6.2 RB6.1 905.51,1250.39 905.51,1023.62 1072.5,815 J2.82@1072.5,712.45
S-_07: J2.84 RA7.2 RB7.1 | length 738
  TopLayer w7.87: J2.84 1188.98,1023.62 1188.98,1250.39 RB7.1 RA7.2
S-_08: J2.86 RA8.2 RB8.1 | length 774.7
  BottomLayer w7.87: RA8.2 RB8.1 1188.98,1250.39 1188.98,1023.62 1277.95,934.65 J2.86
S-_09: J2.22 RA9.2 RB9.1 | length 1434.9
  TopLayer w7.87: J2.22@1830.41,207 1915.91,292.5 1915.91,320 1973.41,377.5 2417.32,1023.62 2417.32,1250.39 RB9.1 RA9.2
S-_10: J2.24 RA10.2 RB10.1 | length 1436.3
  BottomLayer w7.87: J2.24 1927.95,314.55 2060.91,447.5 2060.91,652.5 2417.32,1023.62 2417.32,1250.39 RB10.1 RA10.2
S-_11: J2.73 RA11.2 RB11.1 | length 1004.5
  TopLayer w7.87: J2.73@1880.41,507 1963.41,592.5 2013.41,692.5 2133.86,1023.62 2133.86,1250.39 RB11.1 RA11.2
S-_12: J2.98 RA12.2 RB12.1 | length 839.1
  BottomLayer w7.87: J2.98@1890.91,719.95 1890.91,822.5 2133.86,1023.62 2133.86,1250.39 RB12.1 RA12.2
S-_13: J2.96 RA13.2 RB13.1 | length 767.8
  TopLayer w7.87: J2.96 1777.95,951.18 1850.39,1023.62 1850.39,1250.39 RB13.1 RA13.2
S-_14: J2.94 RA14.2 RB14.1 | length 791
  BottomLayer w7.87: J2.94@1683.41,712.45 1683.41,815 1850.39,1023.62 1850.39,1250.39 RB14.1 RA14.2
S-_15: J2.92 RA15.2 RB15.1 | length 738
  TopLayer w7.87: RA15.2 RB15.1 1566.93,1250.39 1566.93,1023.62 J2.92
S-_16: J2.90 RA16.2 RB16.1 | length 774.7
  BottomLayer w7.87: J2.90 1477.95,934.65 1566.93,1023.62 1566.93,1250.39 RB16.1 RA16.2
pads on no net: H1. H2. H3. H4. J1. J1.9 J1.10 J1.27 J2.

## Keep-outs
Keep-Out Layer:
  region: 2736.22,2185.04 2733.95,2208.08 2727.23,2230.24 2716.32,2250.66 2701.63,2268.56 2683.73,2283.24 2663.31,2294.16 2641.15,2300.88 2618.11,2303.15 2595.07,2300.88 2572.91,2294.16 2552.49,2283.24 2534.59,2268.56 2519.91,2250.66 2508.99,2230.24 2502.27,2208.08 2500,2185.04 2502.27,2162 2508.99,2139.84 2519.91,2119.42 2534.59,2101.52 2552.49,2086.83 2572.91,2075.92 2595.07,2069.2 2618.11,2066.93 2641.15,2069.2 2663.31,2075.92 2683.73,2086.83 2701.63,2101.52 2716.32,2119.42 2727.23,2139.84 2733.95,2162
  region: 255.91,2185.04 253.64,2208.08 246.91,2230.24 236,2250.66 221.31,2268.56 203.41,2283.24 182.99,2294.16 160.84,2300.88 137.8,2303.15 114.75,2300.88 92.6,2294.16 72.18,2283.24 54.28,2268.56 39.59,2250.66 28.68,2230.24 21.95,2208.08 19.68,2185.04 21.95,2162 28.68,2139.84 39.59,2119.42 54.28,2101.52 72.18,2086.83 92.6,2075.92 114.75,2069.2 137.8,2066.93 160.84,2069.2 182.99,2075.92 203.41,2086.83 221.31,2101.52 236,2119.42 246.91,2139.84 253.64,2162
  region: 2736.22,137.8 2733.95,160.84 2727.23,182.99 2716.32,203.41 2701.63,221.31 2683.73,236 2663.31,246.91 2641.15,253.64 2618.11,255.91 2595.07,253.64 2572.91,246.91 2552.49,236 2534.59,221.31 2519.91,203.41 2508.99,182.99 2502.27,160.84 2500,137.8 2502.27,114.75 2508.99,92.6 2519.91,72.18 2534.59,54.28 2552.49,39.59 2572.91,28.68 2595.07,21.95 2618.11,19.68 2641.15,21.95 2663.31,28.68 2683.73,39.59 2701.63,54.28 2716.32,72.18 2727.23,92.6 2733.95,114.75
  region: 255.91,137.8 253.64,160.84 246.91,182.99 236,203.41 221.31,221.31 203.41,236 182.99,246.91 160.84,253.64 137.8,255.91 114.75,253.64 92.6,246.91 72.18,236 54.28,221.31 39.59,203.41 28.68,182.99 21.95,160.84 19.68,137.8 21.95,114.75 28.68,92.6 39.59,72.18 54.28,54.28 72.18,39.59 92.6,28.68 114.75,21.95 137.8,19.68 160.84,21.95 182.99,28.68 203.41,39.59 221.31,54.28 236,72.18 246.91,92.6 253.64,114.75

## Other copper
TopLayer:
  drawing of 12 lines, arcs and shapes, not listed
BottomLayer:
  drawing of 14 lines, arcs and shapes, not listed

## Silkscreen, mask and mechanical layers (free items; w line width, h text height)
Top Solder:
  drawing of 8 lines, arcs and shapes, not listed
Bottom Solder:
  drawing of 8 lines, arcs and shapes, not listed
Mechanical 13:
  text "CHASSIS BRIDGE - 2.2nF / 2kV - BOTTOM" at 0,-98.43 h31.5